# Altium PCB DAP-PCB-REV-3.PcbDoc (part 5 of 5)
Units mm, origin at the board's own origin, x right, y up, seen from the top; angles counter-clockwise.
Board outline 54.75 x 54.75 mm, 6 copper layers (L1 (SIG/PWR), L2 (GND), L3 (SIG), L4 (PWR), L5 (GND), L6 (SIG/PWR)), stack 1.65 mm thick; 309 components, 179 nets, 957 pads, 421 vias.
Unrouted connection lines stored in the file: 36.
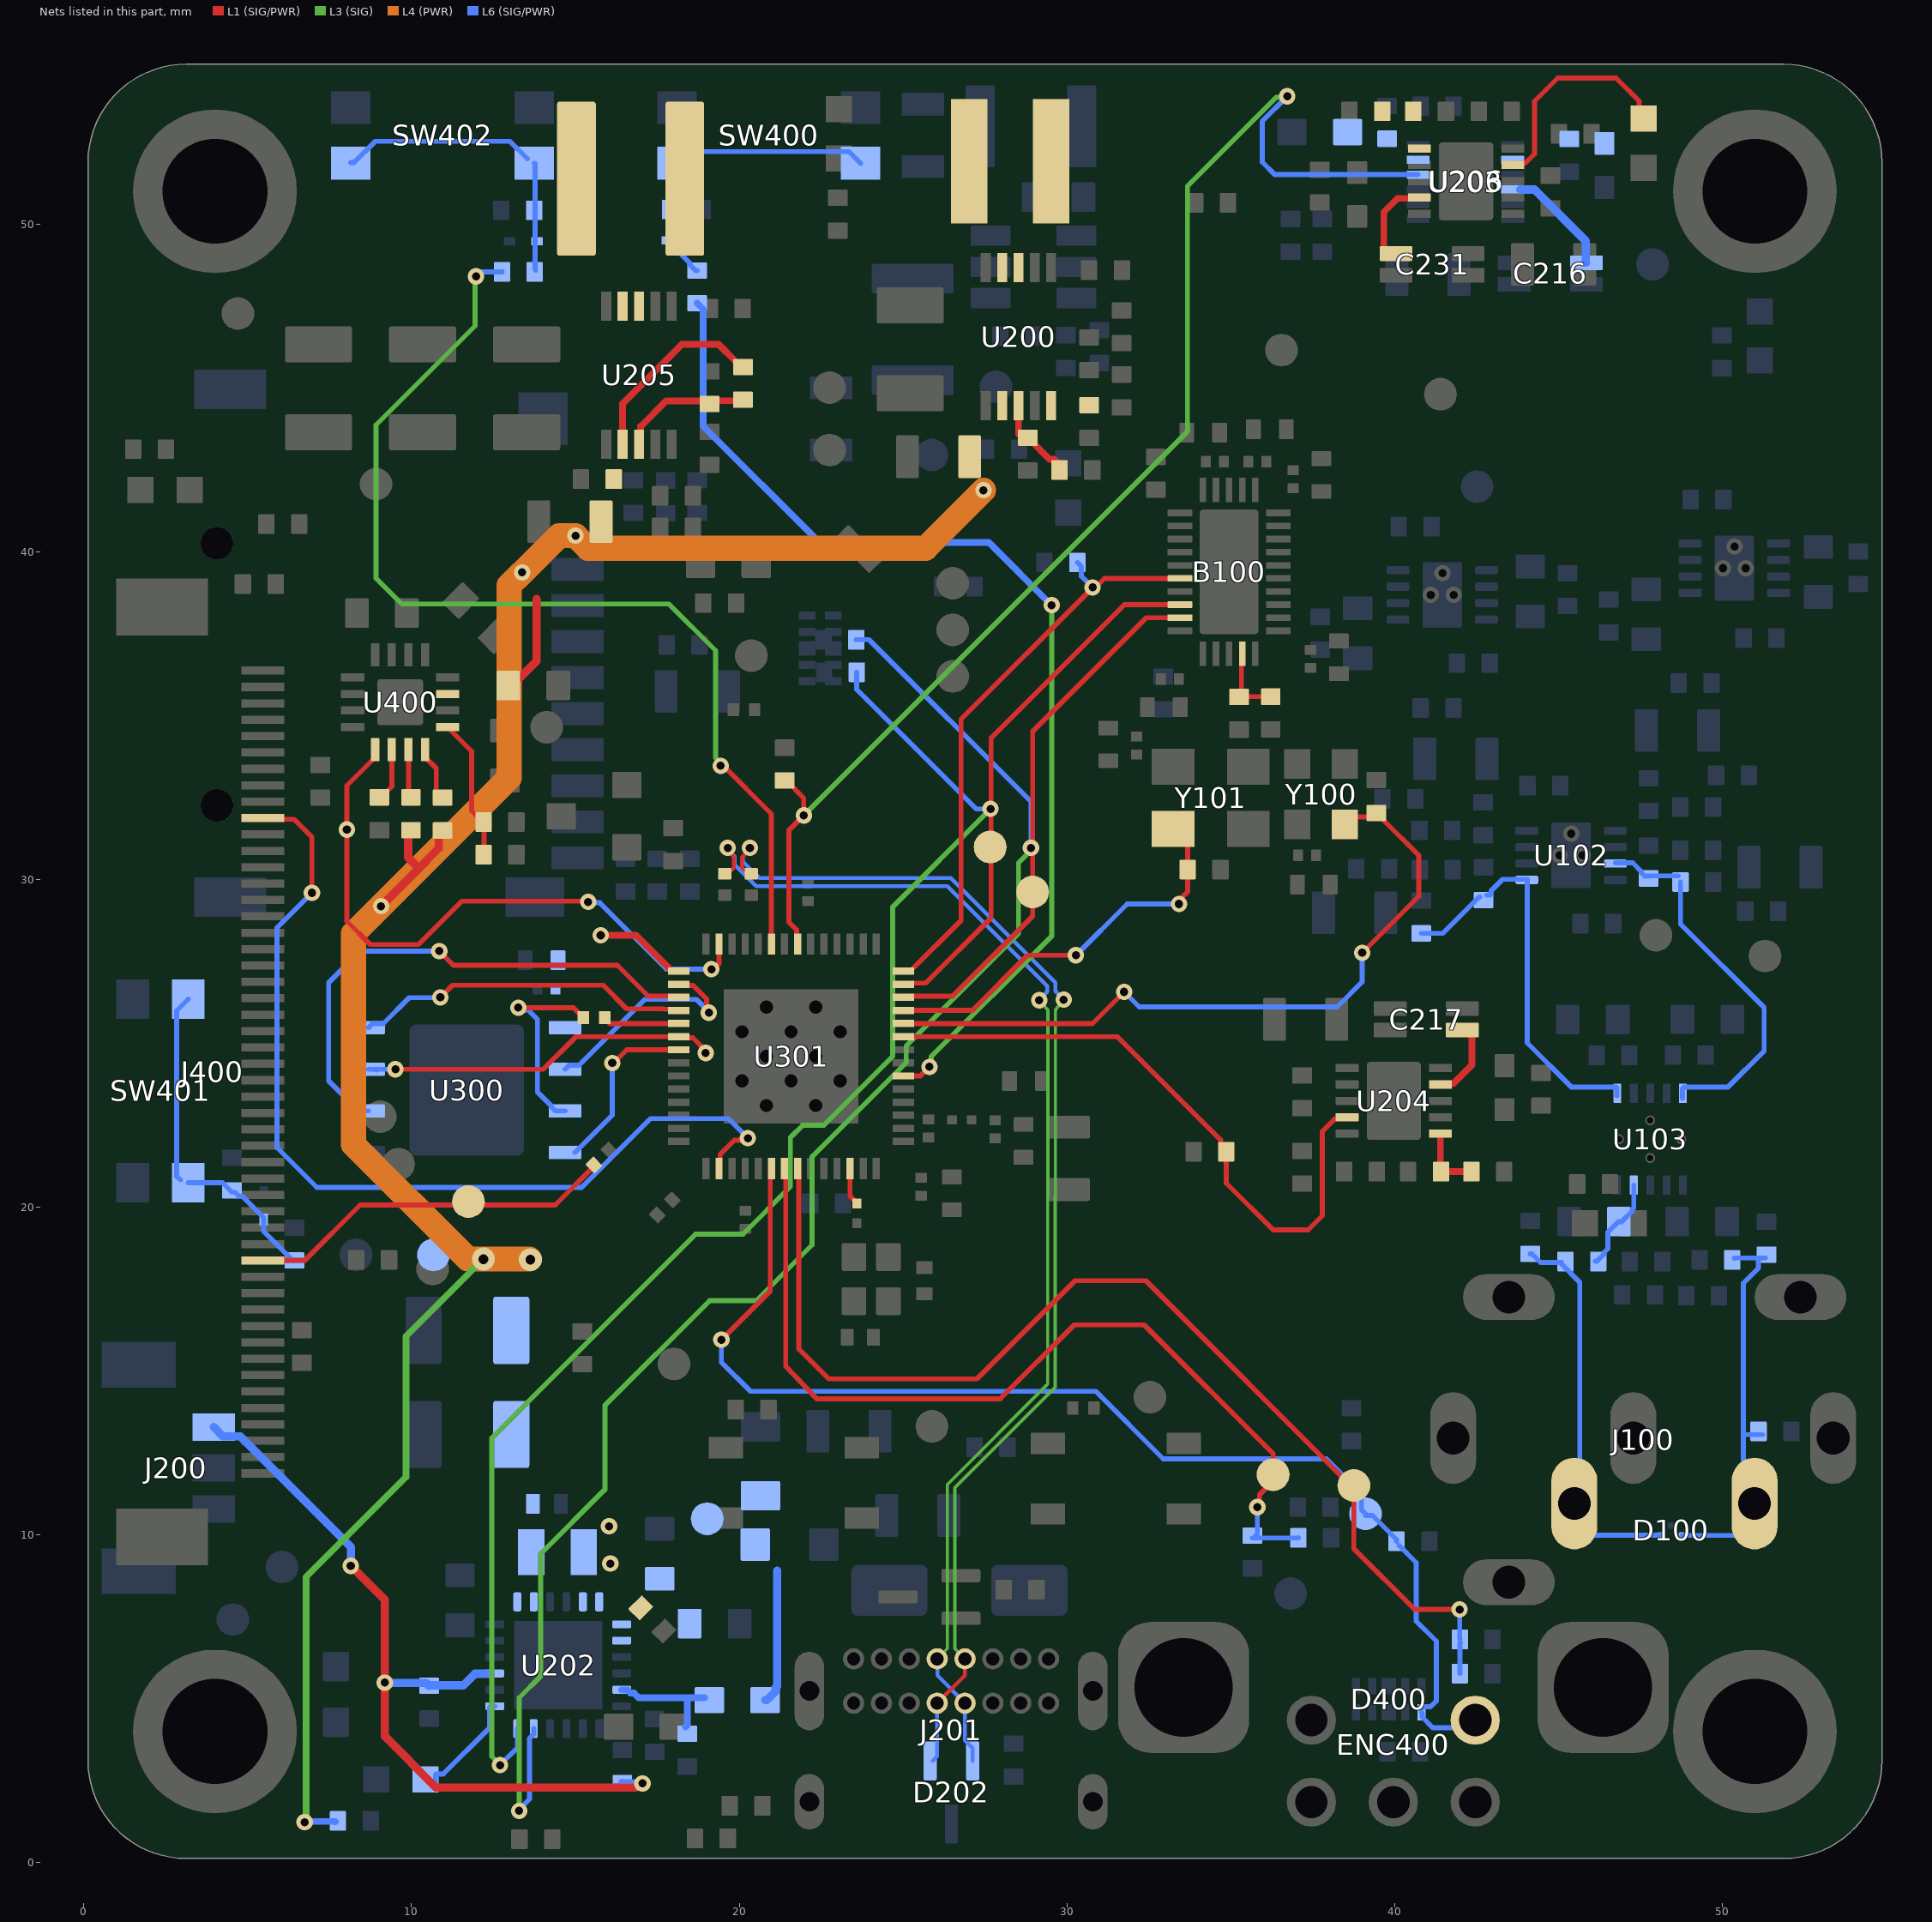
[diagram p7: the nets of this part, all layers, seen from the top]

## Via types
v1: diameter 0.5, hole 0.25, L1 (SIG/PWR) to L6 (SIG/PWR), tented both sides, 335 vias
v2: diameter 0.7, hole 0.35, L1 (SIG/PWR) to L6 (SIG/PWR), tented both sides, 69 vias
v3: diameter 0.7, hole 0.3, L1 (SIG/PWR) to L6 (SIG/PWR), tented both sides, 6 vias
v4: diameter 1.25, hole 0.75, L1 (SIG/PWR) to L6 (SIG/PWR), 6 vias
v5: diameter 0.4/0.4/0.4/0.4/0.4/0.4 (per signal layer), hole 0.2, L1 (SIG/PWR) to L6 (SIG/PWR), tented both sides, 5 vias

## Nets (pads, with @x,y where several pads share a name; then routed paths per layer and width w, separated by ;. In a path a pad name is that pad's centre, name@x,y a point inside that pad or via, vN(x,y) a via of type N, cw(c..) or ccw(c..) an arc to the next point about the centre after c; other vN are vias at no path point) (continued)
NetR410_1: R410.1 U301.6 | length 33.3
  L1 (SIG/PWR) w0.152: U301.6@25.009,24.003 25.527,24.003 v1(25.806,24.282)
  L3 (SIG) w0.152: v1(25.806,24.282) 25.865,24.341 25.865,24.595 29.536,28.266 v1@29.536,38.375
  L6 (SIG/PWR) w0.203: R410.1@18.72,47.582 18.898,47.404 18.898,43.84 22.454,40.284 27.619,40.284 v1(29.536,38.367)
NetR411_1: R411.1 U301.23 | length 32.2
  L1 (SIG/PWR) w0.152: v1@19.431,33.553 20.984,32.001 U301.23@20.984,28.028
  L3 (SIG) w0.152: v1@11.938,48.26 11.938,46.888 8.915,43.866 8.915,39.192 9.703,38.405 17.856,38.405 19.279,36.982 19.279,33.714 19.433,33.56 v1(19.433,33.465)
  L6 (SIG/PWR) w0.152: v1@11.981,48.463 12.057,48.539 R411.1@12.759,48.539
  other v1: 11.968,48.402
NetR420_2: R420.2 U400.3 | length 1.6
  L1 (SIG/PWR) w0.152: U400.3@9.906,33.96 9.906,32.563 R420.2@10.033,32.436
NetR421_2: R421.2 U400.4 | length 1.7
  L1 (SIG/PWR) w0.152: U400.4@10.414,33.96 10.414,33.729 10.754,33.39 10.754,32.604 R421.2@10.897,32.461
NetR422_2: R422.2 U400.2 | length 1.6
  L1 (SIG/PWR) w0.152: R422.2@9.068,32.537 9.1,32.537 9.398,32.835 U400.2@9.398,33.96
NetR423_2: R423.2 R424.2 U400.5 | length 4.4
  L1 (SIG/PWR) w0.152: U400.5@11.1,34.646 11.836,33.909 11.836,32.088 11.951,31.974 12.001,31.974 12.175,31.8 R423.2@12.175,31.75 ; R424.2@12.217,30.734 R423.2@12.217,31.75
NetU301_27: U301.27 U400.1 | length 19.4
  L1 (SIG/PWR) w0.152: U400.1@8.89,33.96 8.89,33.729 8.026,32.866 v1(8.026,31.521) 8.026,28.727 8.738,28.016 10.211,28.016 11.532,29.337 15.367,29.337 v1(15.392,29.312) ; v1@19.177,27.229 19.384,27.436 U301.27@19.384,28.028
  L6 (SIG/PWR) w0.152: v1(15.392,29.312) 15.413,29.291 15.744,29.291 17.774,27.26 v1@19.222,27.26
  other v1: 19.151,27.26
OUTS_1: C216.4 U203.10 | length 3.3
  L6 (SIG/PWR) w0.254: U203.10@43.84,51.054 44.272,51.054 45.838,49.488 45.838,48.835 C216.4@45.855,48.819
OUTS_2: C231.4 U206.9 | length 2.4
  L1 (SIG/PWR) w0.203: C231.4@39.675,49.225 39.675,50.368 40.091,50.785 40.741,50.785 U206.9@40.764,50.808
OUTS_3: C217.4 U204.9 | length 2.5
  L1 (SIG/PWR) w0.203: U204.9@41.405,23.741 41.428,23.764 41.789,23.764 42.367,24.342 42.367,25.201 42.244,25.324 C217.4@42.019,25.324
PG_DAC_LDO+: D204.C U206.4 | length 6.8
  L1 (SIG/PWR) w0.152: U206.4@43.614,51.808 43.663,51.857 43.989,51.857 44.272,52.14 44.272,53.746 44.983,54.458 46.761,54.458 47.467,53.752 47.467,53.219 D204.C@47.498,53.188
PG_LDO+: R223.1 U204.4 U301.9 | length 19.5
  L1 (SIG/PWR) w0.152: U301.9@25.009,25.202 31.541,25.202 34.692,22.051 34.692,21.915 34.738,21.869 R223.1@34.874,21.869 ; R223.1@34.95,21.641 34.866,21.557 34.866,20.734 36.297,19.304 37.363,19.304 37.795,19.736 37.795,22.307 38.18,22.692 38.506,22.692 U204.4@38.555,22.741
PG_LDO-: R241.1 U203.4 U301.21 | length 41
  L1 (SIG/PWR) w0.152: R241.1@21.387,33.02 21.437,33.02 21.971,32.486 v1(21.971,31.953) 21.514,31.496 21.514,28.702 21.75,28.466 21.75,28.061 U301.21@21.784,28.028
  L3 (SIG) w0.152: v1(21.971,31.953) 33.68,43.663 33.68,51.156 36.39,53.865 36.695,53.865 v1(36.728,53.899)
  L6 (SIG/PWR) w0.152: v1(36.728,53.899) 35.966,53.137 35.966,51.892 36.351,51.508 U203.4@40.719,51.508
PGFB_DAC_LDO+: R243.1 R245.2 U206.6 | length 0
  L1 (SIG/PWR) w0.203: R243.1@39.675,53.416 R243.1@39.7,53.442
PGFB_LDO+: R222.1 R228.2 U204.6 | length 2
  L1 (SIG/PWR) w0.203: R228.2@41.405,21.118 U204.6@41.405,22.241 ; R228.2@41.419,21.082 R222.1@42.334,21.082
PGFB_LDO-: R220.1 R224.2 U203.5
PMID_BQ: C200.2 U202.20
POWER_SW: D402.C R401.2 R409.2 SW401.1 SW401.3 | length 10.1
  L6 (SIG/PWR) w0.152: SW401.3@2.946,20.828 2.833,20.942 2.833,25.992 SW401.1@3.187,26.346 ; SW401.3@3.187,20.746 4.231,20.746 R401.2@4.521,20.456 ; R401.2@4.623,20.447 4.738,20.332 4.83,20.332 5.486,19.676 5.486,19.262 6.376,18.372 R409.2@6.426,18.372
RESET: J400.10 U301.44 | length 29.4
  L1 (SIG/PWR) w0.152: J400.10@5.207,31.883 5.256,31.834 6.418,31.834 6.96,31.293 v1(6.96,29.591) ; U301.44@19.384,21.178 19.417,21.211 19.417,21.606 19.851,22.039 20.198,22.039 v1(20.264,22.105)
  L6 (SIG/PWR) w0.152: v1(6.96,29.591) 5.893,28.524 5.893,21.819 7.112,20.599 15.189,20.599 17.293,22.704 19.67,22.704 20.264,22.109 v1(20.264,22.105)
RESETB_DAC: B100.21 R111.2 U301.14 | length 18
  L1 (SIG/PWR) w0.152: U301.14@25.009,27.203 25.224,27.203 26.772,28.75 26.772,34.89 30.747,38.866 30.832,38.866 31.152,39.186 B100.21@33.452,39.186
  L6 (SIG/PWR) w0.152: R111.2@30.324,39.671 30.446,39.548 30.446,39.251 v1(30.785,38.913)
RIGHT_EAR: C124.1 R125.1 U103.9 | length 2.9
  L6 (SIG/PWR) w0.152: R125.1@46.132,18.349 46.18,18.349 46.394,18.563 46.394,18.61 46.514,18.73 46.514,19.234 46.837,19.558 46.937,19.558 47.261,19.882 47.261,19.932 47.304,19.975 U103.9@47.304,20.673
RING: D100.3 J100.3 R117.2 R125.2 | length 11.9
  L6 (SIG/PWR) w0.152: R117.2@44.145,18.575 44.195,18.575 44.457,18.313 R125.2@45.097,18.313 ; R125.2@45.097,18.263 45.656,17.705 J100.3@45.656,10.846 ; J100.3@45.554,10.947 J100.3@45.656,10.846 ; D100.3@48.098,9.985 46.154,9.985 45.656,10.483 J100.3@45.656,10.846
SCL_BQ: B100.23 R208.1 TP200.1 U202.6 U301.13 | length 60.6
  L1 (SIG/PWR) w0.152: U301.13@25.009,26.803 25.043,26.836 25.693,26.836 27.686,28.829 27.686,30.328 27.686,30.988 27.686,32.151 27.686,34.315 31.756,38.386 B100.23@33.452,38.386
  L3 (SIG) w0.152: v1(12.7,2.972) 12.7,2.981 12.446,3.235 12.446,12.954 18.669,19.177 20.117,19.177 21.565,20.625 21.565,22.123 21.94,22.498 22.584,22.498 24.689,24.603 24.689,29.167 27.56,32.038 v1@27.56,32.105
  L6 (SIG/PWR) w0.152: v1(12.7,2.972) 13.228,3.5 U202.6@13.228,4.085 ; R208.1@23.589,36.322 23.589,35.797 27.234,32.151 v1(27.673,32.151)
SCL_LCD: J400.37 R306.2 TP405.1 | length 11.3
  L1 (SIG/PWR) w0.152: J400.37@5.461,18.373 6.74,18.373 8.433,20.066 11.735,20.066 14.386,20.066 15.568,21.247 R306.2@15.568,21.283
SDA_BQ: B100.24 R211.1 TP202.1 U202.5 U301.12 | length 64.8
  L1 (SIG/PWR) w0.152: U301.12@25.009,26.402 25.043,26.436 26.512,26.436 28.956,28.88 28.956,29.235 TP202.1@28.956,29.616 28.956,30.912 v1(28.905,30.963) 28.956,31.013 28.956,34.519 32.423,37.986 B100.24@33.452,37.986
  L3 (SIG) w0.152: v1(13.284,1.575) 13.284,5.029 13.945,5.69 13.945,9.423 15.9,11.379 15.9,13.945 19.101,17.145 20.523,17.145 22.225,18.847 22.225,21.539 25.095,24.409 25.095,24.917 28.524,28.346 28.524,30.505 v1@28.956,30.937
  L6 (SIG/PWR) w0.152: v1(13.284,1.575) 13.284,1.616 13.602,1.934 13.602,3.789 13.728,3.915 U202.5@13.728,4.085 ; R211.1@23.571,37.313 23.579,37.321 23.961,37.321 28.905,32.376 v1(28.905,30.963)
SELECT: D400.1 ENC400.5 R412.2 TP402.1 U301.48 | length 37.5
  L1 (SIG/PWR) w0.152: v1(19.456,15.951) 20.948,17.443 20.948,20.839 20.95,20.842 20.95,21.144 U301.48@20.984,21.178
  L6 (SIG/PWR) w0.152: v1@19.507,15.85 19.456,15.799 19.456,15.264 20.344,14.376 30.886,14.376 32.944,12.319 37.922,12.319 38.995,11.247 38.995,10.764 TP402.1@39.116,10.643 ; TP402.1@39.116,10.592 39.326,10.592 40.064,9.854 R412.2@40.064,9.804 ; R412.2@40.141,9.677 40.665,9.153 40.665,7.366 41.275,6.756 41.275,4.928 41.1,4.752 40.876,4.752 40.827,4.703 D400.1@40.827,4.578 ; D400.1@40.843,4.547 40.843,4.437 41.166,4.115 42.236,4.115 ENC400.5@42.465,4.343
SET_LDO-: C222.2 R232.2 U203.8
SHDN_BB_3.3: C230.2 R237.2 U205.8 | length 4
  L1 (SIG/PWR) w0.203: U205.8@16.942,43.283 16.993,43.334 16.993,43.826 17.769,44.602 C230.2@19.228,44.602 ; C230.2@19.228,44.61 20.073,44.61 R237.2@20.091,44.628
SHDN_BB_3.9: C213.2 R203.2 U200.8 | length 2.4
  L1 (SIG/PWR) w0.203: U200.8@28.524,44.451 28.524,43.594 28.684,43.434 C213.2@28.804,43.434 ; C213.2@28.804,43.402 28.891,43.402 29.473,42.82 29.621,42.82 R203.2@29.718,42.723
SPI_CS0: U300.1 U301.32 | length 10.3
  L1 (SIG/PWR) w0.152: v1(10.878,26.399) 11.25,26.772 15.85,26.772 16.568,26.053 17.699,26.053 17.716,26.036 18.125,26.036 U301.32@18.159,26.003
  L6 (SIG/PWR) w0.152: U300.1@8.684,25.476 8.808,25.6 9.141,25.6 9.932,26.391 v1@10.897,26.391
SPI_D: U300.5 U301.35 | length 5.4
  L1 (SIG/PWR) w0.152: v1(16.126,24.399) 16.169,24.399 16.573,24.803 U301.35@18.159,24.803
  L6 (SIG/PWR) w0.152: U300.5@14.986,21.668 16.126,22.808 v1(16.126,24.399)
SPI_HD: U300.7 U301.30 | length 6.9
  L1 (SIG/PWR) w0.152: U301.30@18.159,26.803 18.193,26.769 18.587,26.769 19.009,26.346 19.009,26 v1(19.076,25.933)
  L6 (SIG/PWR) w0.152: U300.7@14.684,24.206 14.808,24.33 15.11,24.33 17.12,26.34 18.694,26.34 19.076,25.958 v1(19.076,25.933)
SPI_Q: U300.2 U301.34 | length 10.9
  L1 (SIG/PWR) w0.152: v1@9.55,24.206 14.021,24.206 15.017,25.202 U301.34@18.159,25.202 18.193,25.169 18.587,25.169 18.976,24.78 v1(18.976,24.702)
  L6 (SIG/PWR) w0.152: U300.2@8.684,24.206 8.896,24.206 8.921,24.182 8.946,24.206 9.474,24.206 v1@9.5,24.181
  other v1: 9.506,24.206
SPI_WP: U300.3 U301.31 | length 16.3
  L1 (SIG/PWR) w0.152: v1(10.846,27.813) 11.278,27.381 16.281,27.381 17.226,26.436 18.125,26.436 U301.31@18.159,26.402
  L6 (SIG/PWR) w0.152: U300.3@8.684,22.936 8.384,22.936 7.468,23.853 7.468,26.848 8.433,27.813 10.795,27.813 v1@10.82,27.838
SPICLK: R308.2 U301.33 | length 2.4
  L1 (SIG/PWR) w0.152: R308.2@15.895,25.781 15.895,25.756 16.049,25.603 U301.33@18.159,25.603
SPICLK_FL: R308.1 U300.6 | length 6.2
  L1 (SIG/PWR) w0.152: v1(13.259,26.086) 14.94,26.086 15.121,25.905 15.146,25.905 15.245,25.806 R308.1@15.245,25.781
  L6 (SIG/PWR) w0.152: v1(13.259,26.086) 13.325,26.019 13.554,26.019 13.843,25.73 13.843,23.509 14.26,23.092 14.26,23.06 14.384,22.936 U300.6@14.684,22.936
STAT_BQ: D200.C U202.7 | length 3.3
  L6 (SIG/PWR) w0.152: D200.C@10.726,2.457 10.726,2.673 10.751,2.698 10.967,2.698 12.377,4.109 12.377,4.726 12.421,4.77 U202.7@12.543,4.77
SUMM_L: C123.1 R115.2 U102.7 U103.5 | length 11.6
  L6 (SIG/PWR) w0.152: U102.7@46.75,30.505 47.271,30.505 47.534,30.242 47.534,30.205 47.64,30.099 C123.1@47.752,30.099 ; C123.1@47.758,30.106 R115.2@48.66,30.106 ; R115.2@48.731,29.921 48.731,28.639 51.283,26.088 51.283,24.765 50.184,23.667 48.848,23.667 48.793,23.612 U103.5@48.793,23.317
SUMM_R: C118.1 R114.2 U102.1 U103.1 | length 12.3
  L6 (SIG/PWR) w0.152: R114.2@40.818,28.354 41.474,28.354 42.584,29.464 C118.1@42.596,29.464 ; C118.1@42.816,29.522 42.924,29.522 42.947,29.544 42.947,29.652 43.3,30.005 44.05,30.005 44.05,25.013 45.396,23.667 46.76,23.667 46.787,23.64 U103.1@46.787,23.393
SW1_BB_3.3: L204.1 U205.3
SW1_BB_3.9: L200.1 U200.3
SW2_BB_3.3: L204.2 U205.4
SW2_BB_3.9: L200.2 U200.4
SW_BQ: C207.1 L203.1 U202.17 U202.18
  other v1: 16.067,9.119 16.027,10.262
SYS: C203.2 C208.2 C209.2 C210.2 C224.2 C234.2 C412.2 L203.2 R206.2 R237.1 R420.1 R421.1 TP204.1 U200.7 U202.13 U202.14 U205.7 U400.7 | length 75.7
  L1 (SIG/PWR) w0.203: U205.7@16.442,43.283 16.442,44.521 18.251,46.33 19.373,46.33 19.932,45.771 R237.1@20.168,45.771
  L1 (SIG/PWR) w0.254: v1(9.068,29.185) 10.173,30.29 ; R420.1@10.033,31.471 9.988,31.471 9.898,31.381 9.898,30.666 10.173,30.391 10.173,30.29 ; R421.1@10.947,31.496 10.831,31.379 10.831,30.948 10.173,30.29 ; C412.2@12.967,35.866 13.239,36.138 13.29,36.138 13.818,36.666 13.818,38.557
  L3 (SIG) w0.203: v1(6.737,1.23) 6.779,1.272 6.779,8.71 9.83,11.76 9.83,16.053 12.065,18.288 v3@12.065,18.415
  L4 (PWR) w0.762: v1(13.375,39.369) 12.979,38.973 12.979,33.096 8.23,28.346 8.23,21.906 11.72,18.415 v3(12.192,18.415) v3@13.605,18.415 ; v1@13.385,39.369 14.503,40.488 v1(15.006,40.488) 15.387,40.107 25.686,40.107 v1(27.455,41.876)
  L6 (SIG/PWR) w0.203: v1(6.737,1.23) 6.757,1.25 7.666,1.25 R206.2@7.671,1.245
  other v3: 13.626,18.393
TIP: D100.2 J100.2 R127.2 R129.2 R134.2 | length 12.7
  L6 (SIG/PWR) w0.152: D100.2@48.774,9.982 50.451,9.982 51.054,10.585 51.054,10.947 J100.2@51.198,11.091 ; R127.2@50.372,18.44 50.38,18.448 51.11,18.448 51.32,18.448 51.182,18.448 51.11,18.376 51.11,18.14 50.648,17.678 50.648,13.005 ; J100.2@51.156,11.775 50.648,12.283 50.648,13.005 ; J100.2@51.198,10.944 J100.2@51.198,11.091 ; J100.2@51.198,11.775 J100.2@51.198,11.091 ; R129.2@51.24,13.056 50.698,13.056 50.648,13.005
TRI_STATE_22: R106.2 U301.10 Y100.1 | length 22.5
  L1 (SIG/PWR) w0.152: U301.10@25.009,25.603 30.784,25.603 v1(31.75,26.568) ; Y100.1@38.483,31.674 38.72,31.911 39.327,31.911 R106.2@39.446,32.029 39.496,32.029 39.67,31.856 39.67,31.806 40.742,30.734 40.742,29.489 v1(39.014,27.762)
  L6 (SIG/PWR) w0.152: v1(31.75,26.568) 32.207,26.111 38.252,26.111 39.014,26.873 v1(39.014,27.762)
TRI_STATE_24: R107.2 U301.11 Y101.1 | length 12.2
  L1 (SIG/PWR) w0.152: U301.11@25.009,26.003 27.12,26.003 28.804,27.686 v1(30.277,27.686) ; Y101.1@33.241,31.537 33.688,31.09 R107.2@33.688,30.421 ; v1@33.376,29.312 33.688,29.624 R107.2@33.688,30.302
  L6 (SIG/PWR) w0.152: v1(30.277,27.686) 31.842,29.251 33.442,29.251 v1@33.452,29.261
  other v1: 33.422,29.251
TS: J200.3 R214.1 R215.2 U202.9 | length 24.4
  L1 (SIG/PWR) w0.254: v1(8.143,9.053) 9.184,8.011 9.184,5.522 v1@9.195,5.512 ; v1(9.184,5.489) 9.184,3.846 10.744,2.286 16.855,2.286 16.981,2.412 v1(17.047,2.412)
  L6 (SIG/PWR) w0.254: J200.3@3.964,13.29 4.25,13.004 4.776,13.004 8.153,9.627 v1@8.153,9.093 ; v1@9.195,5.478 10.457,5.478 R215.2@10.541,5.394 ; R215.2@10.508,5.41 11.582,5.41 11.935,5.763 U202.9@12.38,5.763 ; R214.1@16.434,2.429 16.442,2.42 17.039,2.42 v1(17.047,2.412)
U0RXD: C405.2 R408.1 TP302.1 U301.50 | length 34.4
  L1 (SIG/PWR) w0.152: U301.50@21.784,21.178 21.818,21.144 21.818,20.842 21.82,20.839 21.82,15.671 22.733,14.757 27.254,14.757 30.251,17.755 32.41,17.755 TP302.1@38.71,11.455 ; TP302.1@38.76,11.506 38.76,9.576 40.615,7.722 v1(41.986,7.722)
  L6 (SIG/PWR) w0.152: R408.1@41.994,5.766 41.994,6.688 C405.2@42.012,6.706 ; C405.2@41.994,6.807 41.99,6.811 41.99,7.624 v1@42.037,7.671
U0TXD: C404.2 R400.2 TP303.1 U301.49 | length 28.1
  L1 (SIG/PWR) w0.152: U301.49@21.418,21.178 21.418,15.147 22.327,14.194 ccw(c22.436,14.3) 22.328,14.192 22.372,14.148 27.965,14.148 30.226,16.408 32.36,16.408 36.297,12.471 36.297,11.638 35.881,11.222 35.881,10.912 v1(35.814,10.846)
  L6 (SIG/PWR) w0.152: C404.2@35.662,9.904 C404.2@35.761,9.904 ; v1(35.814,10.846) 35.814,10.027 35.761,9.974 C404.2@35.761,9.904 ; R400.2@37.067,9.906 37.065,9.904 C404.2@35.761,9.904
USB_D_N: D202.1 J201.A7 J201.B7 R304.2 | length 38.4
  L1 (SIG/PWR) w0.121: v1(20.326,30.963) 20.326,30.917 20.088,30.679 20.088,30.355 20.159,30.285 20.256,30.285 R304.2@20.371,30.17 ; J201.B7@26.042,4.864 26.886,5.708 26.886,6.159 J201.A7@26.899,6.172
  L3 (SIG) w0.101: J201.A7@26.892,6.214 26.581,6.525 26.581,11.442 29.645,14.506 29.645,14.688 29.651,25.973 ccw(c29.322,25.974) 29.651,25.979 ccw(c29.423,25.976) 29.651,25.98 cw(c29.752,25.982) 29.674,26.046 v1(29.903,26.328)
  L6 (SIG/PWR) w0.121: v1(20.326,30.963) 20.326,30.917 20.112,30.702 20.112,30.547 20.618,30.042 26.459,30.042 29.655,26.846 29.655,26.588 29.903,26.341 v1(29.903,26.328) ; D202.1@25.903,3.099 26.043,3.238 26.043,4.863 J201.B7@26.042,4.864
USB_D_P: D202.2 J201.A6 J201.B6 R305.2 | length 38.3
  L1 (SIG/PWR) w0.121: R305.2@19.558,30.17 19.673,30.285 19.77,30.285 19.841,30.355 19.841,30.701 19.649,30.893 v1(19.649,30.962)
  L3 (SIG) w0.101: J201.A6@26.042,6.214 26.353,6.525 26.353,11.537 29.387,14.571 29.417,14.601 29.417,14.685 29.417,14.688 29.423,25.974 ccw(c29.322,25.974) 29.423,25.976 ; v1(29.159,26.314) 29.398,26.041 cw(c29.322,25.974) 29.423,25.977
  L6 (SIG/PWR) w0.121: v1(19.649,30.962) 19.649,30.917 19.865,30.701 19.865,30.445 20.515,29.794 26.356,29.794 29.407,26.743 29.407,26.575 29.159,26.327 v1(29.159,26.314) ; J201.A6@26.035,6.121 26.048,6.109 26.048,5.708 J201.B6@26.892,4.864 26.892,3.729 27.127,3.494 D202.2@27.127,3.099
VC_BB_3.9: C212.2 U200.10
VDD_SPI: C311.2 C312.2 U300.8 U301.29 | length 2.8
  L1 (SIG/PWR) w0.203: v1(15.773,28.296) 16.851,28.296 17.944,27.203 U301.29@18.159,27.203
VDPM_BQ: R202.1 R205.2 U202.23 | length 3.5
  L6 (SIG/PWR) w0.203: U202.23@16.413,5.27 16.583,5.27 16.684,5.169 16.791,5.169 16.931,5.029 R202.1@18.948,5.029 ; R205.2@18.364,4.14 18.415,4.191 18.415,4.961
VOLUME+_SW: D403.C R404.2 R410.2 SW400.1 SW400.3 | length 9.2
  L6 (SIG/PWR) w0.152: D403.C@17.837,49.465 18.496,48.806 18.496,48.756 18.67,48.582 R410.2@18.72,48.582 ; 17.89,49.635 R404.2@17.89,50.444 ; R404.2@17.932,50.47 17.932,51.683 SW400.3@18.104,51.855 ; SW400.3@18.186,52.197 18.198,52.209 23.35,52.209 SW400.1@23.704,51.855
VOLUME-_SW: D404.C R406.2 R411.2 SW402.1 SW402.3 | length 9.2
  L6 (SIG/PWR) w0.152: SW402.3@8.147,51.88 8.247,51.88 8.894,52.527 13.001,52.527 13.534,51.994 SW402.1@13.538,51.994 ; SW402.1@13.747,51.855 13.767,51.836 13.767,50.419 13.767,49.505 13.767,48.616 R411.2@13.792,48.59
VUSB: C202.2 FB200.2 R202.2 R227.2 TP201.1 U202.19 | length 4.1
  L6 (SIG/PWR) w0.254: R202.2@20.789,4.953 20.839,4.953 21.112,5.226 21.112,5.329 21.158,5.375 21.158,8.901
XI: B100.29 R104.2 R105.1 | length 2
  L1 (SIG/PWR) w0.152: R105.1@35.255,35.569 35.331,35.646 B100.29@35.331,36.678 ; R105.1@35.331,35.577 R104.2@36.22,35.577
XTAL_P: L301.2 U301.54 | length 1.1
  L1 (SIG/PWR) w0.152: U301.54@23.384,21.178 23.384,20.337 23.553,20.168 L301.2@23.597,20.168
pads on no net: B100.4 B100.5 B100.6 B100.7 B100.26 B100.28 D400.4 D400.6 D400.7 D400.9 D400.10 D401.6 D401.7 D401.9 D401.10 ENC400.6 ENC400.7 J100.5 J201.A8 J201.B8 J400.33 J400.39 J400.44 J400.45 J400.46 J400.47 J400.S1 J400.S2 J401. U203.7 U301.1 U301.51 U301.52
copper on no net:
  other v4: 0.962,23.546 3.712,23.546 10.947,51.33 20.904,51.33 10.947,54.08 20.904,54.08

## Polygon pours and split planes (outlines as drawn)
+3V3_DAC on L1 (SIG/PWR) "NONET_L06_P-001" (solid, pour order 196): 36.068,41.097 36.068,41.402 36.754,42.088 38.125,42.088 38.125,41.097 36.805,41.097
+LED on L1 (SIG/PWR) "+LED_L01_P036" (solid, pour order 36): 10.735,35.281 14.749,35.281 14.749,34.112 12.488,34.112 11.574,35.027 10.735,35.027
+3V3_DIG on L1 (SIG/PWR) "NONET_L06_P-001" (solid, pour order 195): 35.057,41.518 35.057,44.109 34.193,44.109 34.193,43.245 34.346,43.245 34.625,42.966 34.625,42.483 34.854,42.483 34.854,41.518 34.93,41.518
+3V3_DAC on L1 (SIG/PWR) "NONET_L06_P-001" (solid, pour order 193): 35.255,41.504 35.255,44.094 36.119,44.094 36.119,43.231 35.966,43.231 35.687,42.951 35.687,42.469 35.458,42.469 35.458,41.504 35.382,41.504
GND on L1 (SIG/PWR) "NONET_L06_P-001" (solid, pour order 192): 36.982,36.601 36.982,35.331 37.135,35.179 37.719,35.179 38.608,36.068 38.608,36.601 37.592,36.601
+3V3_ANALOG on L1 (SIG/PWR) "NONET_L06_P-001" (solid, pour order 190): 36.627,32.131 36.627,28.905 37.262,28.905 37.262,31.217 37.414,31.217 37.414,32.131 37.084,32.131
GND on L1 (SIG/PWR) "NONET_L06_P-001" (solid, pour order 189): 33.02,34.773 33.02,34.163 30.861,34.163 30.861,35.001 31.648,35.001 31.877,34.773
GND on L1 (SIG/PWR) "NONET_L06_P-001" (solid, pour order 188): 33.02,36.297 33.02,34.9 32.029,34.9 31.242,35.687 31.242,36.297
+3V3_ANALOG on L1 (SIG/PWR) "NONET_L06_P-001" (solid, pour order 187): 33.884,33.985 33.884,32.893 30.861,32.893 30.861,33.985 33.731,33.985
+3V3_DAC on L1 (SIG/PWR) "NONET_L06_P-001" (solid, pour order 186): 33.249,36.322 33.249,34.95 34.646,34.95 34.646,37.262 34.442,37.262 34.442,36.322
+3V3_DAC on L1 (SIG/PWR) "NONET_L06_P-001" (solid, pour order 185): 36.068,37.694 36.068,36.805 38.608,36.805 38.608,37.694 36.678,37.694
+3V3_DIG on L1 (SIG/PWR) "NONET_L06_P-001" (solid, pour order 184): 26.924,22.911 26.924,22.504 28.118,22.504 28.6,22.022 30.836,22.022 30.836,22.911 27.864,22.911
NetC302_2 on L1 (SIG/PWR) "NONET_L06_P-001" (solid, pour order 183): 24.689,22.911 24.689,22.301 25.324,22.301 25.527,22.504 26.67,22.504 26.67,22.911 25.273,22.911
GND on L1 (SIG/PWR) "NONET_L06_P-001" (solid, pour order 182): 25.349,20.498 25.349,19.507 25.502,19.355 26.162,19.355 26.162,18.771 26.797,18.771 26.797,20.142 26.441,20.498 25.603,20.498
+3V3_DIG on L1 (SIG/PWR) "NONET_L06_P-001" (solid, pour order 181): 23.673,21.488 23.673,20.701 27.737,20.701 27.737,21.488 24.028,21.488
GND on L1 (SIG/PWR) "NONET_L06_P-001" (solid, pour order 180): 21.92,30.734 21.92,29.743 22.276,29.743 22.276,30.734 22.123,30.734
+3V3_DIG on L1 (SIG/PWR) "+3V3_DIG_L01_P072" (solid, pour order 72): 20.066,20.066 20.015,20.066 20.015,19.736 20.371,19.736 20.371,20.066 20.296,20.066 20.296,21.512 20.066,21.512
GND on L1 (SIG/PWR) "NONET_L06_P-001" (solid, pour order 179): 20.371,19.482 20.371,18.339 20.142,18.11 19.761,18.11 19.761,19.482
GND on L1 (SIG/PWR) "NONET_L06_P-001" (solid, pour order 176): 24.003,8.306 25.451,8.306 25.451,7.899 24.003,7.899
GND on L1 (SIG/PWR) "NONET_L01_P155" (solid, shelved, pour order 155): 51.613,0.127 ccw(c51.838,3.168) 54.887,3.123 24.334,3.123 24.028,3.429 24.028,9.652 26.365,11.989 26.365,13.157 25.502,13.157 23.774,11.43 19.304,11.43 18.415,12.319 18.408,12.319 18.408,15.9 19.672,17.183 20.422,17.932 20.422,19.329 19.069,19.329 18.847,19.108 18.847,34.004 26.552,41.709 54.864,41.709 54.864,51.89 ccw(c51.877,51.89) 51.877,54.877 3.123,54.877 ccw(c3.123,51.877) 0.123,51.877 0.123,3.15 ccw(c3.149,3.149) 3.15,0.123 26.318,0.123 26.314,0.127
PGFB_DAC_LDO+ on L1 (SIG/PWR) "NONET_L06_P-001" (solid, pour order 154): 41.123,52.172 41.123,53.873 39.345,53.873 39.345,52.172 40.615,52.172
ILIM_DAC_LDO+ on L1 (SIG/PWR) "NONET_L06_P-001" (solid, pour order 153): 43.256,53.95 43.256,52.172 43.967,52.172 43.967,53.95
EN_DAC_LDO+ on L1 (SIG/PWR) "EN_DAC_LDO+_L01_P152" (solid, pour order 152): 43.262,51.192 45.04,51.192 45.548,51.7 45.548,53.274 44.608,53.274 44.608,52.081 43.973,51.446 43.262,51.446
+3V9 on L1 (SIG/PWR) "NONET_L06_P-001" (solid, pour order 150): 43.256,50.927 43.256,49.86 44.552,49.86 44.552,46.177 46.609,46.177 46.609,50.927
+3V3_DAC on L1 (SIG/PWR) "NONET_L06_P-001" (solid, pour order 149): 40.259,50.444 39.954,50.14 39.954,49.505 40.742,49.505 40.742,48.666 39.548,48.666 39.548,48.209 41.504,48.209 41.504,50.444
NetC231_1 on L1 (SIG/PWR) "NONET_L06_P-001" (solid, pour order 148): 37.338,50.927 37.338,47.295 42.799,47.295 42.799,48.692 41.707,48.692 41.707,48.031 39.345,48.031 39.345,50.927 38.481,50.927
NetC233_1 on L1 (SIG/PWR) "NETC233_1_L01_P147" (solid, pour order 147): 41.129,51.945 37.332,51.945 37.332,51.105 39.831,51.105 40.418,51.691 41.129,51.691
+3V3_ANALOG on L1 (SIG/PWR) "NONET_L06_P-001" (solid, pour order 132): 40.538,24.13 41.732,24.13 42.088,24.486 42.088,24.917 41.377,24.917 41.377,25.806 42.57,25.806 42.57,26.391 40.538,26.391
GND on L1 (SIG/PWR) "NONET_L06_P-001" (solid, pour order 144): 40.832,20.726 39.167,20.726 39.167,24.917 37.516,24.917 37.516,27.33 38.837,27.33 39.04,27.127 39.04,25.629 40.361,25.629 40.361,24.435 40.792,24.435
ILIM_LDO+ on L1 (SIG/PWR) "NONET_L06_P-001" (solid, pour order 145): 38.202,22.377 38.202,20.752 38.913,20.752 38.913,22.377
+3V9 on L1 (SIG/PWR) "NONET_L06_P-001" (solid, pour order 143): 38.913,23.622 35.611,23.622 35.611,27.33 37.338,27.33 37.338,24.74 38.913,24.74 38.913,24.003
NetC217_1 on L1 (SIG/PWR) "NONET_L06_P-001" (solid, pour order 142): 44.856,23.825 42.748,23.825 42.748,26.568 40.361,26.568 40.361,25.832 39.218,25.832 39.218,27.356 44.856,27.356
+3V3_DIG on L1 (SIG/PWR) "+3V3_DIG_L01_P127" (solid, pour order 127): 22.073,27.711 22.073,29.007 21.92,29.159 21.92,29.515 22.301,29.515 22.301,28.778 22.301,27.711 22.123,27.711
SYS on L1 (SIG/PWR) "SYS_L01_P120" (solid, pour order 120): 15.367,40.869 14.732,40.869 14.427,40.564 14.427,40.183 12.954,40.183 12.954,38.329 16.612,38.329 16.612,43.713 16.281,43.713 16.281,42.545 15.367,42.545
BOOT_BQ on L1 (SIG/PWR) "BOOT_BQ_L01_P118" (solid, pour order 118): 17.602,7.595 17.221,7.214 17.221,6.655 18.237,5.639 19.355,5.639 19.355,6.35 18.11,7.595
SW_BQ on L1 (SIG/PWR) "SW_BQ_L01_P117" (solid, pour order 117): 16.713,7.366 15.596,8.484 15.596,10.719 16.281,10.719 17.424,9.576 17.424,7.798 16.993,7.366
+3V9 on L1 (SIG/PWR) "+3V9_L01_P021" (solid, pour order 21): 21.082,48.616 22.631,48.616 22.631,46.406 27.686,46.406 27.686,43.993 21.082,43.993
DVDD on L1 (SIG/PWR) "DVDD_L01_P097" (solid, pour order 97): 32.41,41.504 34.265,41.504 34.265,42.266 32.41,42.266
SW2_BB_3.9 on L1 (SIG/PWR) "SW2_BB_3.9_L01_P019" (solid, pour order 19): 28.179,48.222 27.874,48.222 27.874,49.264 27.213,49.924 25.41,49.924 25.41,54 27.965,54 27.965,50.036 28.179,49.822
SW1_BB_3.9 on L1 (SIG/PWR) "SW1_BB_3.9_L01_P020" (solid, pour order 20): 28.372,48.184 28.677,48.184 28.677,49.276 29.286,49.886 31.14,49.886 31.14,54 28.677,54 28.677,50.089 28.372,49.784
SYS on L1 (SIG/PWR) "SYS_L01_P022" (solid, pour order 22): 28.172,41.478 28.172,44.905 27.868,44.905 27.868,43.838 27.817,43.788 26.67,43.788 26.67,41.478
VC_BB_3.9 on L1 (SIG/PWR) "VC_BB_3.9_L01_P023" (solid, pour order 23): 30.988,44.907 29.362,44.907 29.362,43.993 30.988,43.993
NetC212_1 on L1 (SIG/PWR) "NETC212_1_L01_P024" (solid, pour order 24): 31.318,44.653 31.318,44.044 31.039,43.764 30.353,43.764 30.353,43.256 31.979,43.256 31.979,44.653
FB_BB_3.9 on L1 (SIG/PWR) "FB_BB_3.9_L01_P080" (solid, pour order 80): 31.979,45.11 31.979,46.609 31.293,46.609 31.293,46.279 30.886,45.872 30.201,45.872 30.201,45.11
FB_BB_3.3 on L1 (SIG/PWR) "FB_BB_3.3_L01_P017" (solid, pour order 17): 17.297,38.1 19.406,38.1 19.406,40.107 18.034,40.107 18.034,40.488 17.932,40.589 17.932,42.24 17.577,42.596 17.577,43.713 17.297,43.739
NetC226_2 on L1 (SIG/PWR) "NETC226_2_L01_P016" (solid, pour order 16): 19.38,42.901 18.288,42.901 18.288,41.402 19.406,41.402 19.406,42.875
SW1_BB_3.3 on L1 (SIG/PWR) "SW1_BB_3.3_L01_P015" (solid, pour order 15): 16.776,47.032 17.081,47.032 17.081,48.074 17.742,48.734 19.545,48.734 19.545,53.89 17.869,53.89 17.386,53.408 17.386,49.242 16.776,48.633
SW2_BB_3.3 on L1 (SIG/PWR) "SW2_BB_3.3_L01_P014" (solid, pour order 14): 16.586,47.066 16.281,47.066 16.281,48.108 15.621,48.768 13.818,48.768 13.818,53.924 15.494,53.924 15.977,53.442 15.977,49.276 16.586,48.666
+3V3_DIG on L1 (SIG/PWR) "+3V3_DIG_L01_P011" (solid, pour order 11): 10.541,42.799 10.541,41.478 5.664,41.478 5.664,44.933 16.104,44.933 16.104,42.799 13.056,42.799
+3V3_DIG on L1 (SIG/PWR) "+3V3_DIG_L01_P077" (solid, pour order 77): 4.521,33.503 4.521,32.766 6.502,32.766 6.502,33.503 4.699,33.503
+3V3_DIG on L1 (SIG/PWR) "+3V3_DIG_L01_P078" (solid, pour order 78): 4.572,17.018 4.572,15.773 7.849,15.773 7.849,17.018 4.623,17.018
EN_LDO+ on L1 (SIG/PWR) "EN_LDO+_L01_P065" (solid, pour order 65): 38.913,23.368 37.135,23.368 36.627,22.86 36.627,21.285 37.567,21.285 37.567,22.479 38.202,23.114 38.913,23.114
NetC223_1 on L1 (SIG/PWR) "NETC223_1_L01_P064" (solid, pour order 64): 41.059,22.606 44.856,22.606 44.856,23.343 42.253,23.343 41.77,22.86 41.059,22.86
+LED on L1 (SIG/PWR) "+LED_L01_P037" (solid, pour order 37): 5.486,40.183 5.486,36.22 6.045,36.22 6.045,40.183
SYS on L1 (SIG/PWR) "SYS_L01_P035" (solid, pour order 35): 11.938,35.789 12.421,36.271 13.31,36.271 13.31,35.458 11.659,35.458 11.582,35.535 10.744,35.535 10.744,35.789
NetC410_2 on L1 (SIG/PWR) "NETC410_2_L01_P034" (solid, pour order 34): 10.287,36.5 10.541,36.5 10.541,36.982 12.065,38.506 12.04,38.506 11.43,39.116 10.617,38.303 10.617,37.541 10.287,37.211
NetC410_1 on L1 (SIG/PWR) "NETC410_1_L01_P033" (solid, pour order 33): 10.744,36.043 11.862,36.043 13.183,37.363 12.548,37.998 12.446,37.998 10.744,36.297
NetC411_1 on L1 (SIG/PWR) "NETC411_1_L01_P032" (solid, pour order 32): 9.271,36.5 9.271,37.313 8.966,37.617 7.747,37.617 7.747,38.633 8.992,38.633 8.992,37.948 9.525,37.414 9.525,36.5
NetC411_2 on L1 (SIG/PWR) "NETC411_2_L01_P031" (solid, pour order 31): 10.033,36.5 10.033,37.313 10.363,37.643 10.363,38.659 9.22,38.659 9.22,37.973 9.779,37.414 9.779,36.5
no net on Top Overlay "NONET_L06_P-001" (solid): 24.618,15.358 ccw(c24.618,14.858) 24.118,14.858 24.118,14.792 ccw(c24.653,14.826) 24.618,14.292 ccw(c24.102,14.825)
no net on Top Overlay "NONET_L06_P-001" (solid): 30.717,9.029 ccw(c30.717,8.529) 30.217,8.529 30.217,8.463 ccw(c30.752,8.497) 30.717,7.963 ccw(c30.201,8.496)
no net on Top Overlay "NONET_L06_P-001" (solid): 7.706,40.839 ccw(c7.706,40.339) 7.206,40.339 7.206,40.272 ccw(c7.74,40.307) 7.706,39.772 ccw(c7.189,40.306)
no net on Top Overlay "NONET_L06_P-001" (solid): 44.699,27.059 ccw(c44.699,26.559) 44.199,26.559 44.199,26.492 ccw(c44.734,26.527) 44.699,25.992 ccw(c44.182,26.525)
no net on Top Overlay "NONET_L06_P-001" (solid): 20.906,43.211 ccw(c21.406,43.211) 21.406,42.711 21.473,42.711 ccw(c21.438,43.246) 21.973,43.211 ccw(c21.44,42.694)
no net on Top Overlay "NONET_L06_P-001" (solid): 7.424,49.487 ccw(c7.424,48.987) 6.924,48.987 6.924,48.92 ccw(c7.458,48.955) 7.424,48.42 ccw(c6.907,48.954)
no net on Top Overlay "NONET_L06_P-001" (solid): 30.118,40.892 ccw(c30.118,40.392) 29.618,40.392 29.618,40.326 ccw(c30.153,40.36) 30.118,39.826 ccw(c29.602,40.359)
no net on Top Overlay "NONET_L06_P-001" (solid): 44.828,47.354 ccw(c44.828,46.854) 44.328,46.854 44.328,46.787 ccw(c44.863,46.822) 44.828,46.287 ccw(c44.311,46.82)
no net on Top Overlay "NONET_L06_P-001" (solid): 24.056,30.15 ccw(c24.056,29.65) 23.556,29.65 23.556,29.583 ccw(c24.091,29.618) 24.056,29.083 ccw(c23.54,29.616)
+3V3_DIG on L6 (SIG/PWR) "NONET_L06_P-001" (solid, pour order 198): 18.237,37.592 18.237,34.976 17.374,34.976 17.374,35.814 14.249,35.814 14.249,36.5 15.824,36.5 16.916,37.592
GND on L6 (SIG/PWR) "NONET_L06_P-001" (solid, pour order 197): 39.599,4.318 39.599,6.782 40.056,6.782 40.056,4.318
+3V3_ANALOG on L6 (SIG/PWR) "+3V3_ANALOG_L06_P056" (solid, pour order 56): 51.232,38.908 51.232,36.881 52.07,36.881 52.07,38.908
PGFB_LDO- on L6 (SIG/PWR) "NONET_L06_P-001" (solid, pour order 161): 41.072,51.816 38.735,51.816 38.125,52.426 38.125,53.34 39.091,53.34 39.573,52.857 40.132,52.857 40.132,52.095 41.072,52.095
GND on L6 (SIG/PWR) "L6 (SIG/PWR)-GND" (solid, shelved, pour order 169): 51.82,0.112 51.866,0.112 ccw(c51.866,3.123) 54.877,3.123 52.231,3.123 44.756,3.123 44.145,3.734 41.173,6.706 41.173,9.347 31.293,9.347 29.058,11.582 27,11.582 26.289,12.294 26.289,14.046 23.241,14.046 23.241,12.09 25.527,12.09 25.527,10.211 25.959,9.779 26.467,9.779 26.467,6.96 29.058,6.96 29.058,3.048 28.016,3.048 27.342,2.388 24.943,2.388 23.876,3.454 23.876,6.706 21.463,6.706 21.45,5.88 18.999,8.331 18.999,33.61 23.005,37.49 35.712,37.49 36.017,37.795 36.017,39.446 36.779,40.234 41.072,44.526 43.358,44.526 43.358,42.418 43.536,42.24 44.577,42.24 45.898,43.561 45.898,44.519 54.864,44.526 54.864,51.89 ccw(c51.877,51.89) 51.877,54.877 3.123,54.877 ccw(c3.123,51.877) 0.123,51.877 0.123,3.15 ccw(c3.149,3.149) 3.138,0.123 51.82,0.123
-3V3 on L6 (SIG/PWR) "L6 (SIG/PWR)--3V3" (solid, pour order 167): 40.945,39.294 40.945,39.649 40.615,39.649 40.615,41.097 39.827,41.097 39.827,39.294
NetR219_1 on L6 (SIG/PWR) "NONET_L06_P-001" (solid, pour order 163): 37.313,51.181 36.525,50.394 36.525,49.911 38.1,49.911 38.1,50.368 38.633,50.902 41.072,50.902 41.072,51.181
ILIM_LDO- on L6 (SIG/PWR) "NONET_L06_P-001" (solid, pour order 162): 41.072,52.273 41.072,53.899 40.361,53.899 40.361,52.273
-3V9 on L6 (SIG/PWR) "NONET_L06_P-001" (solid, pour order 160): 41.072,50.724 38.862,50.724 38.862,47.727 40.589,47.727 40.589,49.251 41.072,49.733 41.072,50.292
SET_LDO- on L6 (SIG/PWR) "NONET_L06_P-001" (solid, pour order 158): 43.256,52.095 44.094,52.095 44.856,52.857 46.761,52.857 46.761,52.07 45.009,52.07 44.78,51.841 43.256,51.841 43.256,51.968
NetC216_1 on L6 (SIG/PWR) "NONET_L06_P-001" (solid, pour order 159): 44.907,51.841 47.117,51.841 47.117,46.914 43.129,46.914 43.129,48.412 44.171,48.412 44.171,47.625 46.533,47.625 46.533,49.301 44.907,50.927
-3V3 on L6 (SIG/PWR) "NONET_L06_P-001" (solid, pour order 141): 43.256,50.724 44.044,50.724 45.187,49.581 45.187,48.387 46.355,48.387 46.355,47.93 44.602,47.93 44.602,48.844 43.409,50.038 43.256,50.038
GND on L6 (SIG/PWR) "GND_L06_P119" (solid, pour order 119): 19.431,8.636 19.431,7.62 20.853,6.198 20.853,8.636
GND on L6 (SIG/PWR) "NONET_L06_P-001" (solid, pour order 140): 23.673,26.162 23.673,23.597 21.336,21.26 21.031,21.26 18.999,23.292 18.999,26.264 20.599,27.864 22.022,27.864
NetR204_1 on L6 (SIG/PWR) "NETR204_1_L06_P107" (solid, pour order 107): 27.076,48.057 27.076,46.228 28.296,46.228 28.296,48.057 27.356,48.057
SW_BQ on L6 (SIG/PWR) "SW_BQ_L06_P113" (solid, pour order 113): 15.926,8.28 16.51,8.865 16.51,10.846 15.672,10.846 15.672,10.312 14.427,10.312 14.427,9.093 15.113,8.407 15.113,7.671 15.926,7.671
VDD_SPI on L6 (SIG/PWR) "VDD_SPI_L06_P128" (solid, pour order 128): 14.199,25.273 14.199,28.575 16.154,28.575 16.154,26.289 15.138,25.273
-3V9 on L6 (SIG/PWR) "-3V9_L06_P103" (solid, pour order 103): 31.42,46.076 31.42,43.967 22.073,43.967 22.073,46.076 30.226,46.076
LDO_BQ on L6 (SIG/PWR) "LDO_BQ_L06_P116" (solid, pour order 116): 16.129,4.902 16.866,4.902 17.12,4.648 17.882,4.648 17.882,3.988 17.069,3.988 16.891,3.81 16.891,3.073 16.129,3.073
BAT+ on L6 (SIG/PWR) "BAT+_L06_P115" (solid, pour order 115): 11.074,7.493 12.878,7.493 12.878,6.604 11.074,6.604
SYS on L6 (SIG/PWR) "SYS_L06_P114" (solid, pour order 114): 9.5,19.202 9.5,17.882 12.116,17.882 12.116,11.43 13.056,10.49 13.056,7.671 13.868,7.671 13.868,8.509 14.122,8.763 14.122,19.202
PMID_BQ on L6 (SIG/PWR) "PMID_BQ_L06_P112" (solid, pour order 112): 16.129,6.883 17.12,6.883 18.44,8.204 19.228,8.204 19.228,6.655 17.348,6.655 16.129,6.655
VUSB on L6 (SIG/PWR) "VUSB_L06_P111" (solid, pour order 111): 16.129,7.137 16.129,7.925 17.297,9.093 18.161,9.093 18.364,9.296 18.364,11.862 21.412,11.862 21.412,8.814 18.364,8.814 16.688,7.137 16.586,7.137
NetC221_2 on L6 (SIG/PWR) "NETC221_2_L06_P110" (solid, pour order 110): 19.863,14.046 22.962,14.046 22.962,12.065 19.863,12.065 19.863,13.792
NetC219_2 on L6 (SIG/PWR) "NETC219_2_L06_P109" (solid, pour order 109): 21.615,6.985 26.137,6.985 26.137,9.601 25.73,9.601 25.197,10.135 25.197,11.862 21.615,11.862 21.615,7.442
NetC205_1 on L6 (SIG/PWR) "NETC205_1_L06_P108" (solid, pour order 108): 31.369,46.279 31.369,48.133 29.591,48.133 29.591,47.092 28.575,47.092 28.575,46.279
NetC201_2 on L6 (SIG/PWR) "NETC201_2_L06_P106" (solid, pour order 106): 29.693,49.327 29.693,54.458 31.14,54.458 31.14,49.327 30.175,49.327
NetC201_1 on L6 (SIG/PWR) "NETC201_1_L06_P104" (solid, pour order 104): 23.8,47.219 26.746,47.219 26.746,48.26 29.439,48.26 29.439,51.359 28.473,51.359 28.473,49.124 23.8,49.124
+3V9 on L6 (SIG/PWR) "+3V9_L06_P105" (solid, pour order 105): 24.892,49.352 24.892,52.273 25.756,52.273 26.822,53.34 26.822,54.432 28.296,54.432 28.296,49.352 27.864,49.352
+3V3_ANALOG on L6 (SIG/PWR) "+3V3_ANALOG_L06_P040" (solid, pour order 40): 47.117,30.124 47.117,28.194 46.355,28.194 46.355,30.124 46.457,30.124
-3V3 on L6 (SIG/PWR) "-3V3_L06_P044" (solid, pour order 44): 48.59,41.935 48.59,40.081 49.505,40.081 49.505,41.935
+3V3_ANALOG on L6 (SIG/PWR) "+3V3_ANALOG_L06_P042" (solid, pour order 42): 43.129,38.049 42.443,38.049 42.443,36.271 43.129,36.271
-3V3 on L6 (SIG/PWR) "-3V3_L06_P041" (solid, pour order 41): 44.526,33.299 44.526,31.344 43.663,31.344 43.663,33.299
+3V3_ANALOG on L6 (SIG/PWR) "+3V3_ANALOG_L06_P039" (solid, pour order 39): 46.328,27.102 46.328,25.361 46.785,24.904 46.785,24.142 47.166,23.761 47.166,23.202 47.346,23.202 47.346,27.102
-3V3 on L6 (SIG/PWR) "-3V3_L06_P038" (solid, pour order 38): 49.251,27.153 49.251,25.349 48.793,24.892 48.793,24.13 48.438,23.774 48.438,22.835 48.235,22.835 48.235,27.153
GND on L2 (GND) "GND_L02_P099" (solid, pour order 99): 3.123,0.123 21.031,0.123 51.877,0.123 ccw(c51.877,3.123) 54.877,3.123 54.877,51.877 ccw(c51.877,51.877) 51.877,54.877 3.123,54.877 ccw(c3.123,51.877) 0.123,51.877 0.123,3.123 ccw(c3.123,3.123)
no net on Bottom Overlay "NONET_L06_P-001" (solid): 45.663,44.058 ccw(c45.663,43.558) 45.163,43.558 45.163,43.492 ccw(c45.697,43.526) 45.663,42.992 ccw(c45.146,43.525)
no net on Bottom Overlay "NONET_L06_P-001" (solid): 5.327,23.219 ccw(c5.827,23.219) 5.827,22.719 5.894,22.719 ccw(c5.859,23.253) 6.394,23.219 ccw(c5.86,22.702)
no net on Bottom Overlay "NONET_L06_P-001" (solid): 45.946,46.135 ccw(c45.946,45.635) 45.446,45.635 45.446,45.568 ccw(c45.981,45.603) 45.946,45.068 ccw(c45.429,45.602)
no net on Bottom Overlay "NONET_L06_P-001" (solid): 25.871,41.926 ccw(c25.871,41.426) 25.371,41.426 25.371,41.359 ccw(c25.905,41.394) 25.871,40.859 ccw(c25.354,41.393)
no net on Bottom Overlay "NONET_L06_P-001" (solid): 14.657,46.606 ccw(c14.657,46.106) 14.157,46.106 14.157,46.039 ccw(c14.692,46.074) 14.657,45.539 ccw(c14.141,46.073)
no net on Bottom Overlay "NONET_L06_P-001" (solid): 15.127,13.564 ccw(c15.127,13.064) 14.627,13.064 14.627,12.997 ccw(c15.162,13.032) 15.127,12.497 ccw(c14.611,13.03)
no net on Bottom Overlay "NONET_L06_P-001" (solid): 5.749,47.032 ccw(c5.749,46.532) 5.249,46.532 5.249,46.465 ccw(c5.784,46.5) 5.749,45.965 ccw(c5.233,46.499)
no net on Bottom Overlay "NONET_L06_P-001" (solid): 38.642,22.729 ccw(c38.641,22.229) 38.142,22.229 38.142,22.162 ccw(c38.676,22.197) 38.642,21.662 ccw(c38.125,22.196)
-3V3 on L4 (PWR) "NONET_L06_P-001" (solid, pour order 173): 44.59,31.872 cw(c44.894,31.872) 44.894,32.176 45.883,32.176 cw(c45.885,31.872) 46.19,31.872 46.19,29.535 cw(c45.834,29.535) 45.834,29.179 44.964,29.179 cw(c44.964,29.553) 44.59,29.553 44.59,29.555
-3V3 on L4 (PWR) "NONET_L06_P-001" (solid, pour order 172): 40.746,39.789 cw(c41.05,39.789) 41.05,40.094 42.039,40.094 cw(c42.041,39.789) 42.346,39.789 42.346,37.452 cw(c41.99,37.452) 41.99,37.096 41.12,37.096 cw(c41.12,37.471) 40.746,37.471 40.746,37.472
-3V3 on L4 (PWR) "NONET_L06_P-001" (solid, pour order 171): 49.555,40.64 cw(c49.86,40.64) 49.86,40.945 50.849,40.945 cw(c50.851,40.64) 51.156,40.64 51.156,38.303 cw(c50.8,38.303) 50.8,37.948 49.93,37.948 cw(c49.93,38.322) 49.555,38.322 49.555,38.323
+3V3_DIG on L4 (PWR) "+3V3_DIG_L04_P123" (solid, pour order 123): 3.123,0.123 21.031,0.123 28.067,0.123 28.067,54.877 3.123,54.877 ccw(c3.123,51.877) 0.123,51.877 0.123,3.123 ccw(c3.123,3.123)
GND on L4 (PWR) "GND_L04_P125" (solid, pour order 125): 27.889,54.877 33.68,54.877 33.68,0.123 27.889,0.123
-3V3 on L4 (PWR) "-3V3_L04_P102" (solid, pour order 102): 46.558,22.962 49.047,22.962 49.047,21.184 46.558,21.184 46.558,22.809
GND on L5 (GND) "GND_L05_P122" (solid, pour order 122): 3.123,0.123 21.031,0.123 51.877,0.123 ccw(c51.877,3.123) 54.877,3.123 54.877,51.877 ccw(c51.877,51.877) 51.877,54.877 3.123,54.877 ccw(c3.123,51.877) 0.123,51.877 0.123,3.123 ccw(c3.123,3.123)
GND on L3 (SIG) "GND_L03_P139" (solid, pour order 139): 3.123,0.123 21.031,0.123 51.877,0.123 ccw(c51.877,3.123) 54.877,3.123 54.877,51.877 ccw(c51.877,51.877) 51.877,54.877 3.123,54.877 ccw(c3.123,51.877) 0.123,51.877 0.123,3.123 ccw(c3.123,3.123)

## Other copper
L1 (SIG/PWR):
  pour cut-out: 41.554,43.002 42.037,42.52 42.037,41.402 39.573,41.402 39.573,42.266 40.31,43.002
  pour cut-out: 19.025,40.538 19.025,40.208 19.533,40.208 19.533,38.887 19.964,39.319 19.964,40.538
  pour cut-out: 15.799,28.27 15.799,27.381 16.281,27.381 17.221,26.441 18.161,26.441 18.161,26.975 16.84,28.296
  pour cut-out: 8.077,32.156 8.077,29.159 6.934,29.159 6.934,31.318 6.401,31.852 6.401,32.156 7.468,32.156
  pour cut-out: 17.196,42.774 16.662,42.774 16.662,38.278 17.196,38.278 17.196,41.885
  pour cut-out: 18.847,19.685 16.281,17.12 16.281,15.926 15.545,15.189 15.062,15.189 15.062,14.783 14.681,14.402 14.529,14.402 14.529,19.202 14.91,19.202 16.078,20.371 18.847,20.371 18.847,20.396
  pour cut-out: 16.053,25.248 16.053,23.571 15.418,22.936 9.042,22.936 8.89,23.089 10.058,24.257 14.072,24.257 14.072,24.282 15.011,25.222
  pour cut-out: 10.592,36.957 10.592,36.525 10.693,36.424 12.37,38.1 12.751,38.1 12.852,38.202 12.852,38.557 12.192,38.557 11.1,37.465
  pour cut-out: 19.253,1.676 19.253,0.123 17.094,0.123 17.094,1.676 19.075,1.676
  pour cut-out: 12.014,26.594 12.014,25.73 16.383,25.73 16.383,26.619 12.294,26.619
  pour cut-out: 8.382,33.325 8.001,32.944 8.001,31.902 8.661,31.902 8.661,32.893
  pour cut-out: 8.204,29.439 8.204,28.854 9.068,27.991 10.236,27.991 11.608,29.362 12.014,29.362 12.014,30.429 11.862,30.429 11.862,32.41 10.922,32.41 10.922,31.318 9.042,29.439
  pour cut-out: 8.915,21.59 6.223,18.898 6.223,19.685 8.915,22.377
  pour cut-out: 16.815,22.276 16.815,21.082 14.986,19.253 9.22,19.253 7.798,17.831 7.239,17.831 6.121,18.948 6.248,18.948 8.585,21.285 14.529,21.285 15.519,22.276 16.789,22.276
  pour cut-out: 4.369,36.678 4.369,34.341 4.699,34.341 4.699,36.678
  pour cut-out: 27.711,45.034 29.362,45.034 30.124,45.796 30.124,46.203 27.711,46.203
L3 (SIG):
  pour cut-out: 20.168,36.22 20.168,34.214 21.285,33.096 21.666,33.477 21.666,36.043 21.488,36.22
  pour cut-out: 15.773,18.771 15.011,18.771 13.868,19.914 13.868,27.559 13.462,27.965 14.351,28.854 14.63,28.854 14.63,24.562 15.824,23.368 15.773,23.317
  pour cut-out: 19.583,33.299 19.761,33.299 20.371,33.909 20.117,34.163 20.117,37.592 17.729,39.98 17.653,39.903 9.627,39.903 8.992,39.268 9.627,38.633 9.627,38.43 17.704,38.43 19.329,36.805 19.329,33.325
  pour cut-out: 24.79,25.171 24.79,29.286 26.67,31.166 27.889,31.166 28.524,30.531 28.524,28.296 25.197,24.968
  pour cut-out: 25.095,24.867 25.095,24.765 25.502,24.359 29.54,28.397 29.54,30.861 28.905,30.861 28.55,30.505 28.55,28.397 25.375,25.222
L4 (PWR):
  pour cut-out: 31.496,4.166 31.039,3.708 31.039,3.226 33.045,1.219 33.807,1.219 34.214,1.626 34.214,3.81
  pour cut-out: 30.328,26.924 24.638,32.614 18.796,32.614 18.796,29.388 24.841,29.388 27.305,26.924 30.099,26.924
  pour cut-out: 28.219,12.446 29.972,14.199 29.972,24.714 30.328,25.07 30.328,26.924 28.092,26.924 28.092,12.446
L6 (SIG/PWR):
  pour cut-out: 44.78,51.689 44.78,51.054 44.628,51.054 44.348,51.333 43.993,51.333 43.993,51.689 44.45,51.689
  pour cut-out: 9.195,19.279 14.224,19.279 14.224,17.043 14.376,16.891 16.764,16.891 19.279,19.406 19.279,21.311 17.805,19.837 9.195,19.837
  pour cut-out: 24.841,52.375 24.359,52.375 24.359,50.648 24.841,50.648 24.841,52.222
  pour cut-out: 20.904,54.877 20.904,52.857 18.923,52.857 18.034,53.746 16.764,53.746 16.027,54.483 16.027,54.877
  pour cut-out: 18.999,26.111 18.999,22.682 17.272,22.682 15.189,20.599 14.122,20.599 14.122,23.952 14.427,24.257 15.037,24.257 17.145,26.365 18.669,26.365
  pour cut-out: 2.819,27.127 2.819,21.311 1.702,21.311 1.702,27.127 2.235,27.127
  pour cut-out: 26.645,54.877 26.645,54.559 28.448,54.559 28.448,51.359 29.591,51.359 29.591,54.534 31.318,54.534 31.318,54.877
  pour cut-out: 19.253,4.369 20.523,4.369 20.523,5.563 19.253,5.563 19.253,4.801
  pour cut-out: 17.17,6.147 17.17,5.08 19.025,5.08 19.025,6.147 17.755,6.147
  pour cut-out: 19.304,22.733 19.304,21.387 17.755,19.837 6.782,19.837 6.782,20.904 7.112,20.574 15.011,20.574 17.145,22.708 19.177,22.708
  pour cut-out: 16.104,24.663 16.104,22.835 14.808,21.539 14.122,21.539 14.122,24.663
  pour cut-out: 13.97,25.171 13.97,24.333 15.088,24.333 17.069,26.314 18.872,26.314 19.507,26.949 19.152,27.305 17.729,27.305 16.561,28.473 16.256,28.169 16.256,26.289 15.138,25.171 14.884,25.171

## Silkscreen, mask and mechanical layers (free items; w line width, h text height)
Top Overlay:
  drawing of 88 lines, arcs and shapes, not listed
  text "3V3 DIGITAL" at 7.904,48.735 h0.47
  text "GND" at 2.444,47.034 h0.5
  text "3V3DAC" at 35.338,46.856 h0.5
  text "3V3 DAC" at 45.302,46.601 h0.47
  text "3V9" at 21.674,43.723 h0.47 r90
  text "GND" at 40.722,43.554 h0.5
  text "+3V3D" at 5.629,41.776 h0.5
  text "GND" at 22.002,41.776 h0.5
  text "DAC" at 30.626,40.15 h0.47
  text "LED DRIVER" at 8.243,40.087 h0.47
  text "D2" at 26.114,39.707 h0.5
  text "DIGITAL AUDIO PLAYER" at 38.448,39.659 h0.83
  text "Alexander Loker" at 40.642,38.364 h0.83
  text "D1" at 24.879,37.306 h0.5
  text "GND" at 18.065,36.493 h0.5
  text "MCLK" at 25.534,34.893 h0.5
  text "+LED" at 15.05,34.332 h0.5
  text "SCL" at 27.044,31.691 h0.5
  text "MCU" at 24.566,29.38 h0.47
  text "+3V3A" at 46.917,29.025 h0.5
  text "SDA" at 28.303,28.365 h0.5
  text "GND" at 50.551,26.409 h0.5
  text "3V3 ANALOG" at 45.168,26.307 h0.47
  text "MOSI" at 10.126,22.752 h0.5
  text "D/CX" at 10.473,21.177 h0.5
  text "SCL_SPI" at 8.048,19.743 h0.5
  text "GND" at 9.937,16.859 h0.5
  text "TEST_CHIP_PU" at 19.732,15.782 h0.23
  text "UPLOAD" at 25.094,14.623 h0.47
  text "BOOT" at 33.299,13.938 h0.5
  text "GND" at 25.126,12.033 h0.5
  text "USB-C" at 31.279,8.273 h0.47
  text "U0TXD/ENCA" at 36.735,6.341 h0.5 r90
  text "U0RXD/ENCB" at 38.97,5.889 h0.5 r90
Bottom Overlay:
  drawing of 95 lines, arcs and shapes, not listed
  text "GND" at 48.356,49.396 h0.5
  text "SD-CARD" at 9.284,46.296 h0.47
  text "VOLUME +/-" at 20.077,45.839 h0.47
  text "-3V3" at 48.15,45.382 h0.47
  text "-3V9" at 28.955,43.808 h0.5
  text "ANALOG AUDIO STAGE" at 53.85,43.325 h0.47
  text "-3V3" at 43.51,42.843 h0.5
  text "GND" at 25.242,42.691 h0.5
  text "-3V9" at 28.16,41.191 h0.47
  text "POWER" at 6.078,26.076 h0.47 r90
  text "OUTPUT OP-AMP" at 44.81,21.989 h0.47
  text "SYS" at 11.27,19.246 h0.5
  text "GND" at 8.91,17.265 h0.5
  text "CHARGER" at 18.718,12.819 h0.47
  text "VUSB" at 19.564,11.322 h0.5
  text "SELECT" at 42.586,10.61 h0.5
  text "BAT" at 6.731,9.696 h0.5
  text "GND" at 3.703,7.181 h0.5
  text "GND" at 37.51,6.902 h0.5
Mechanical 1:
  the board outline again, w0.254